# Altium PCB GR_carte_alim27.PcbDoc
Units mil, origin at the board's own origin, x right, y up, seen from the top; angles counter-clockwise.
Board outline 2769.97 x 3325 mil, 2 copper layers (Top Layer, Bottom Layer); 54 components, 25 nets, 128 pads, 0 vias.
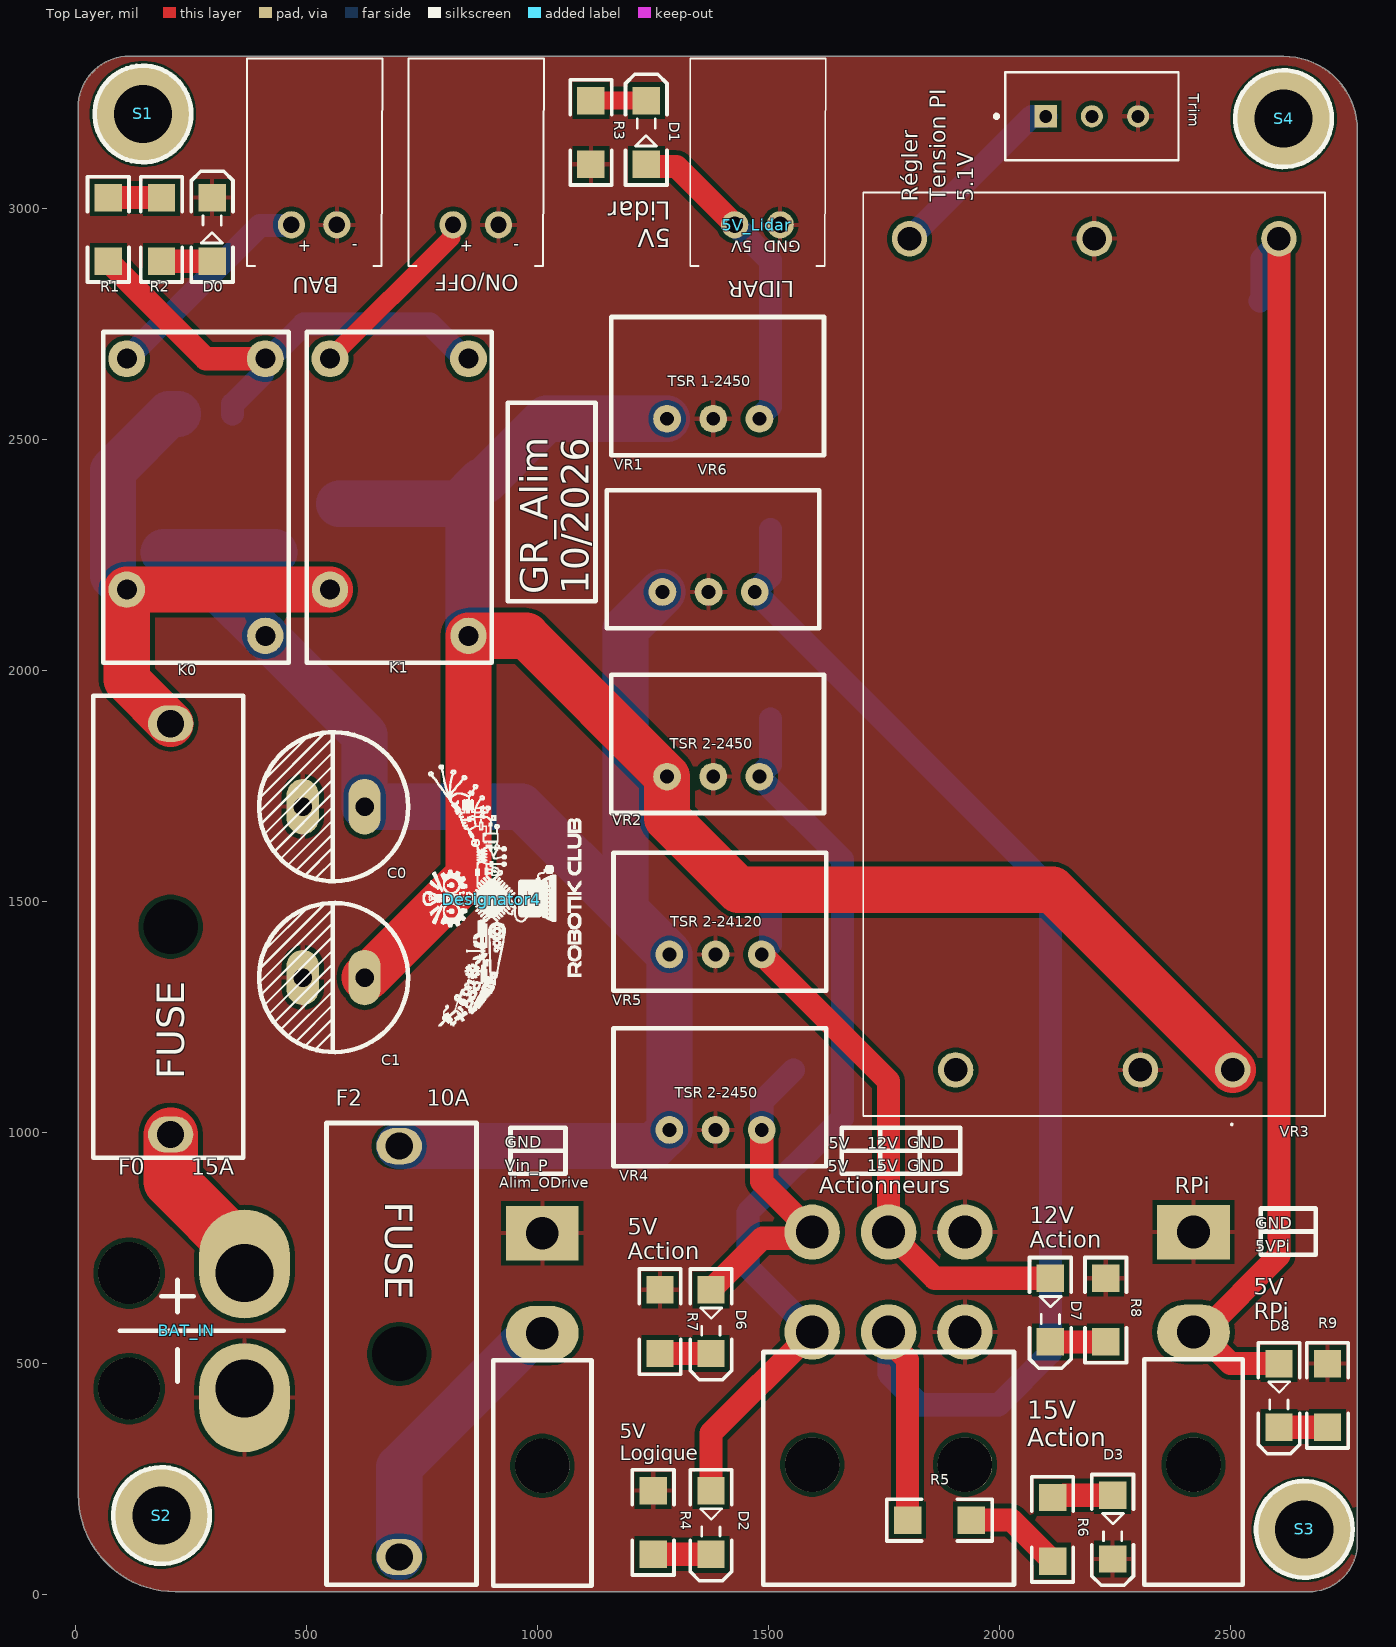
[diagram p0: Top Layer view]
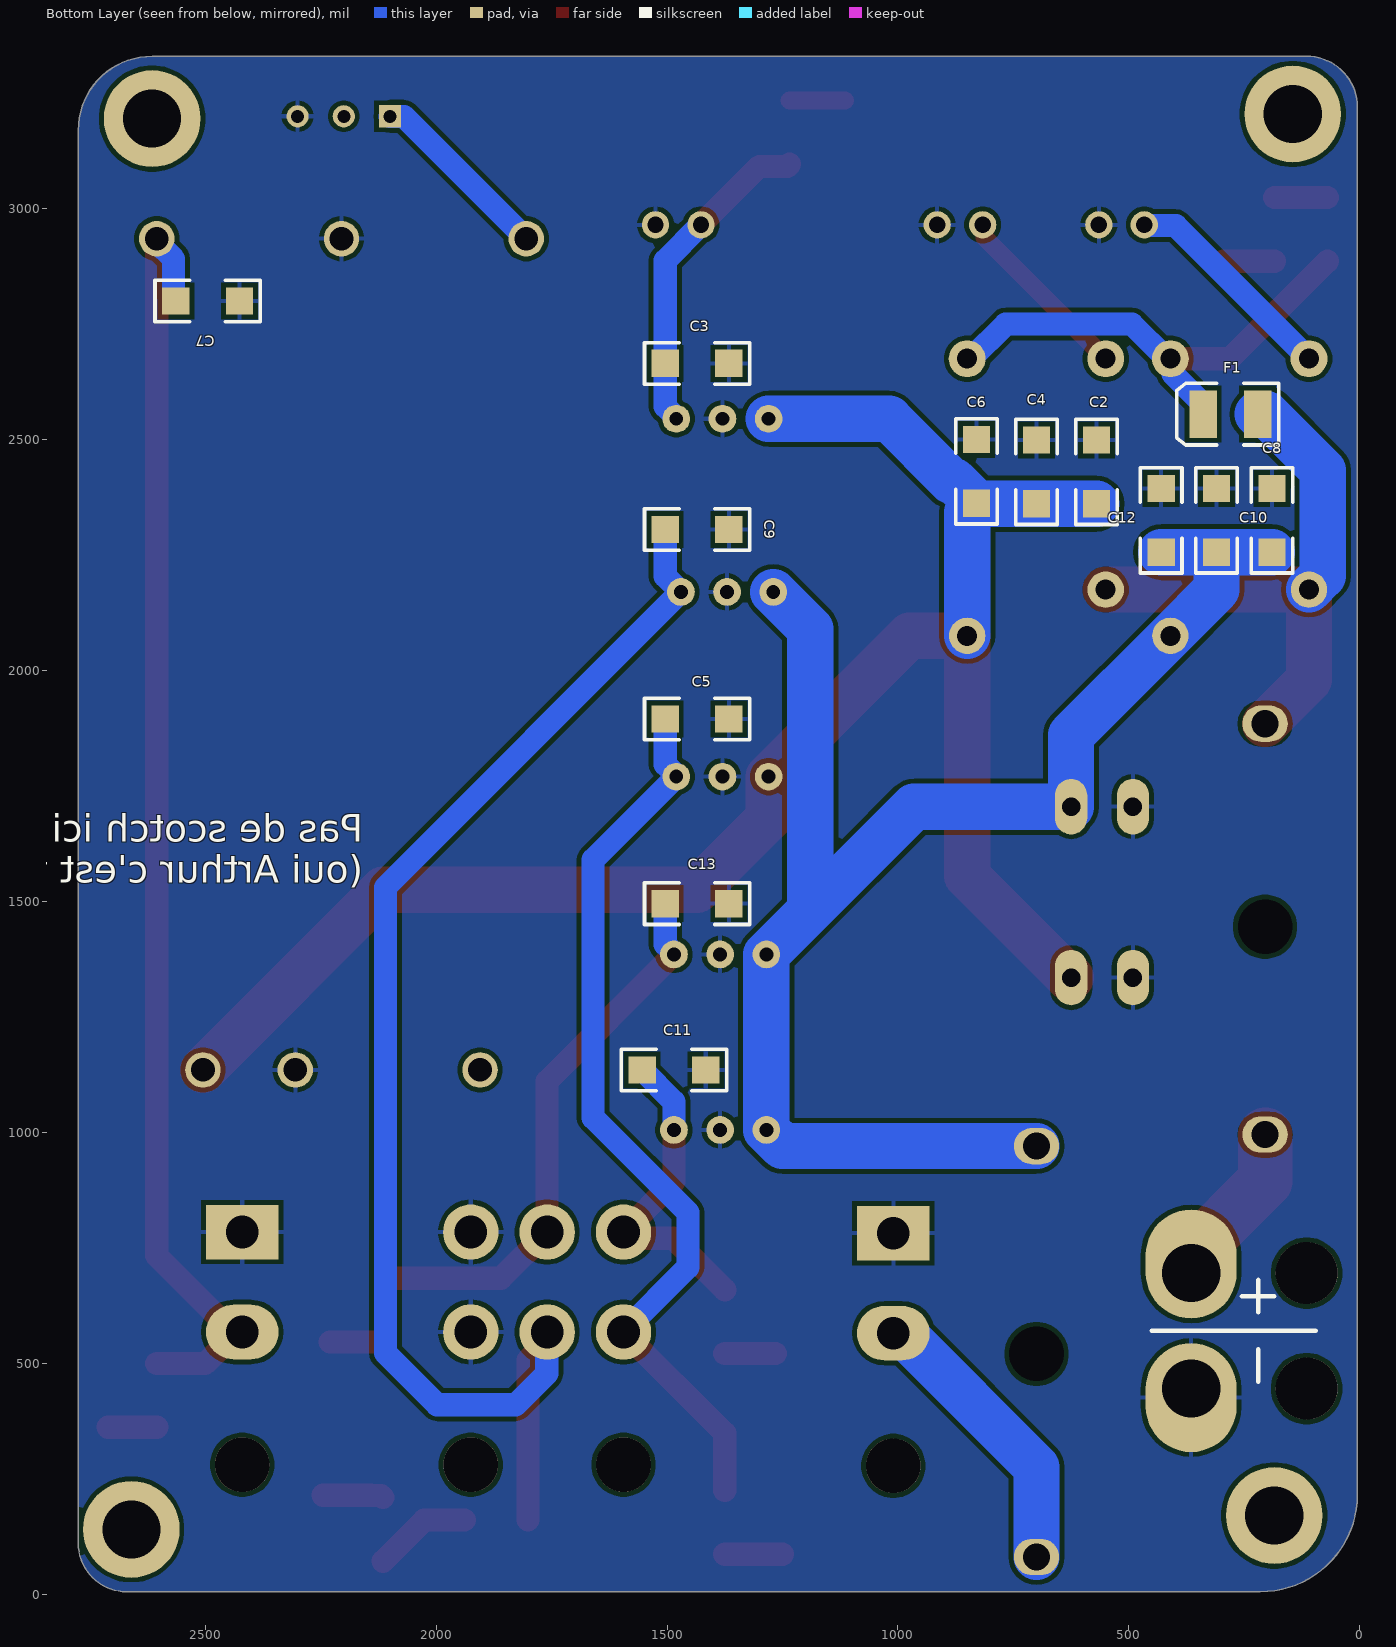
[diagram p1: Bottom Layer view, seen from below]

## Layer stack, top to bottom
Top Solder: solder mask 0.4, Solder Resist, Dk 3.5
Top Layer: signal copper 1.4
Dielectric 1: dielectric 12.6, FR-4, Dk 4.8
Bottom Layer: signal copper 1.4
Bottom Solder: solder mask 0.4, Solder Resist, Dk 3.5

## Board outline
5.03,215 5.03,3220 cw(c115.03,3220) 115.03,3330 2615,3330 cw(c2615,3170) 2775,3170 2775,110 cw(c2670,110) 2670,5 215.03,5 cw(c215.03,215)

## Design rules (kind name [scope] priority, off if disabled: settings)
Clearance [All] p1: gap=10 ignorepadtopadclearanceinfootprint=FALSE
PolygonConnect [All] p1: connectstyle=Relief reliefconductorwidth=10 reliefentries=4 polygonreliefangle="90 Angle" airgapwidth=10
RoutingVias [All] p1: holewidth=28 width=50 viastyle="Through Hole" minholewidth=28 minwidth=50 maxholewidth=28 maxwidth=50
SolderMaskExpansion [All] p1: expansion=4 istentingtop=FALSE
SupplyNets "Schematic Supply Nets_12" [InNet('A3_15V')] p1: voltage=0.000
SupplyNets "Schematic Supply Nets_9" [InNet('Vin_P')] p2: voltage=0.000
SupplyNets "Schematic Supply Nets_8" [InNet('V_Rel')] p3: voltage=0.000
SupplyNets "Schematic Supply Nets_7" [InNet('Vin_L')] p4: voltage=0.000
SupplyNets "Schematic Supply Nets_6" [InNet('5V_Pi')] p5: voltage=0.000
SupplyNets "Schematic Supply Nets_5" [InNet('A2_12V')] p6: voltage=0.000
SupplyNets "Schematic Supply Nets_4" [InNet('V_Bat')] p7: voltage=0.000
SupplyNets "Schematic Supply Nets_3" [InNet('5V_L')] p8: voltage=0.000
SupplyNets "Schematic Supply Nets_2" [InNet('A1_5V')] p9: voltage=0.000
SupplyNets "Schematic Supply Nets_1" [InNet('GND')] p10: voltage=0.000
SupplyNets "Schematic Supply Nets" [InNet('5V_Lid')] p11: voltage=0.000
Width [InNetClass('Power')] p1: maxlimit=100 minlimit=10 preferedwidth=59.06
30 further rules are at their usual default settings.

## Components (designator, comment, footprint, x,y, rotation, side; value= is the part's Value field where it differs from the comment)
5V_Lidar "Header 2H" S2B-XH-A 1426.57,2965 r0 top
Actionneurs "MinifitJr 3x2H" MOLEX_MINIFITJR_3X2 1759.68,567.4 r0 top
Alim_ODrive "MinifitJR 2H" Molex_MiniFitJr_2x1H 1010,565 r270 top
BAT_IN "Battery Onboard Solder" "Battery SALE" 365,445 r90 top
BAU "S2B-XH-A" S2B-XH-A 466.61,2965 r0 top
C0 "Cap2" Condensateur 625.03,1705 r180 top value=100µF
C1 "Cap2" Condensateur 625.03,1335 r180 top value=100µF
C2 "Cap" "Capacitor 1206" 570.03,2430 r270 bottom value=10µF
C3 "(optional)" "Capacitor 1206" 1435.03,2665 r0 bottom value=10µF
C4 "Cap" "Capacitor 1206" 700.03,2430 r270 bottom value=10µF
C5 "(optional)" "Capacitor 1206" 1435.03,1895 r0 bottom value=22µF
C6 "Cap" "Capacitor 1206" 830.03,2431.1 r270 bottom value=47µF
C7 "Cap" "Capacitor 1206" 2495,2800 r180 bottom value="220 uF"
C8 "Cap" "Capacitor 1206" 190,2325 r90 bottom value=10µF
C9 "(optional)" "Capacitor 1206" 1435.03,2305 r0 bottom value=10µF
C10 "Cap" "Capacitor 1206" 310,2325 r270 bottom value=10µF
C11 "(optional)" "Capacitor 1206" 1485,1135 r0 bottom value=10µF
C12 "Cap" "Capacitor 1206" 430,2325 r270 bottom value=10µF
C13 "(optional)" "Capacitor 1206" 1435.03,1495 r0 bottom value=22µF
D0 "V_Rel" KP-3216SEC 295.03,2955 r90 top
D1 "5V_L" KP-3216SEC 1235.03,3165 r90 top
D2 "5V_Lid" KP-3216SEC 1375.03,155 r270 top
D3 "V_Rel" KP-3216SEC 2245,145 r270 top
D6 "A_1" KP-3216SEC 1375.03,590 r270 top
D7 "A_2_12V" KP-3216SEC 2110,615 r270 top
D8 "A_2_12V" KP-3216SEC 2605,430 r270 top
Designator4 "Comment" Logo_lowres 900,1505 r90 top
F0 "8A max" "Fuse - duplicate" 205,995 r90 top
F1 "500mA" 3.5X2.8X1.9 280.03,2555 r0 bottom
F2 "8A max" "Fuse - duplicate" 700,970 r270 top
K0 "Relay-SPST" Relay 260.03,2375 r0 top
K1 "Relay-SPST" Relay 700.03,2375 r0 top
ON/OFF "S2B-XH-A" S2B-XH-A 816.61,2965 r0 top
R1 "Res2" "Resistor 1206" 70.03,2955 r90 top value=1K3
R2 "Res2" "Resistor 1206" 185.03,2955 r270 top value=1K3
R3 "Res2" "Resistor 1206" 1115.03,3165 r90 top value=300
R4 "Res2" "Resistor 1206" 1250.03,155 r270 top value=300
R5 "Res2" "Resistor 1206" 1870,160 r0 top value=1K3
R6 "Res2" "Resistor 1206" 2115,140 r90 top value=1K3
R7 "300" "Resistor 1206" 1265,590 r90 top
R8 "1K3" "Resistor 1206" 2230,615 r90 top
R9 "1K3" "Resistor 1206" 2710,430 r90 top
RPi "Header 2H" Molex_MiniFitJr_2x1H 2420,567.4 r270 top
S1 "Screw M3" "Screw M3" 145.03,3205 r0 top
S2 "Screw M3" "Screw M3" 185.03,170 r0 top
S3 "Screw M3" "Screw M3" 2660,140 r0 top
S4 "Screw M3" "Screw M3" 2615,3195 r0 top
Trim "30k" TRIM_3296W-1-303 2200,3200 r0 top
VR1 "TSR 1-2450" TRS 1280.03,2545 r180 top
VR2 "TSR 2-2450" TRS 1280.03,1770 r180 top
VR3 "TEN_30-2411WIN" TEN302411WIN 2505,1135 r0 top
VR4 "TSR 2-2450" TRS 1285.03,1005 r180 top
VR5 "TSR 2-24120" TRS 1285.03,1385 r180 top
VR6 "TSR 2-24150" TRS 1270,2170 r180 top

## Footprints (in the part's own frame and the unit in brackets; to place one, negate y for a bottom-side part, rotate by r counter-clockwise, add the part's x,y. Pads: shape width x height; smd on the part's side, far side on the other; paste and mask are expansions set on the pad)
3.5X2.8X1.9 [mm] "SM LED; 2 C-Bend Leads; Body 3.5 x 2.8 x 1.9 mm, inc leads (LxWxH typ)"
  rect 1.5x2.6 smd: 1(-1.5,0) 2(1.5,0)
  silkscreen extent -2.65,-1.7 2.95,1.7
"Battery SALE" [mm] "Connecteur Batterie"
  round 3.4 hole 3.4: 0(0,6.35) 0(6.35,6.35)
  oval 6x5 hole 3.2 copper offset -0.5,0: 1(0,0)
  oval 6x5 hole 3.2 copper offset 0.5,0: 2(6.35,0)
  silkscreen extent 0.38,-2.16 5.97,6.86
"Capacitor 1206" [mm]
  rect 1.5x1.5 smd: 1(-1.75,0) 2(1.75,0)
  silkscreen extent -2.89,-1.14 2.89,1.14, body extent -1.97,-0.99 1.97,0.96, height 1.3
Condensateur [mil]
  oval 70x120 hole 40: 1(0,0) 2(133.86,0)
  silkscreen extent -94,-161 228,161, body extent -93,-160 227,160, height 500
"Fuse - duplicate" [mm] "Porte-fusible monté sur circuit 10 (UL) A, 6.3 (VDE) A, fusible Cartouche, 893-0574"
  round 2 hole 3: 0(11.43,0)
  oval 2x2.5 hole 1.5: 1(0,0) 2(22.6,0)
  silkscreen extent -1.27,-4 24.13,4.25, body extent -1.27,-4.29 24.13,4.29, height 11.41
KP-3216SEC [mm]
  rect 1.5x1.5 smd: 1(-1.75,0) 2(1.75,0)
  silkscreen extent -2.89,-1.14 3.2,1.14, body extent -1.7,-0.79 1.5,0.81, height 1.1
Logo_lowres [mil]
  silkscreen extent -276,-194 291,148
Molex_MiniFitJr_2x1H [mm] "Connecteur Molex 2"
  rect 3x4 hole 1.8: 1(-5.5,0)
  oval 3x4 hole 1.8: 2(0,0)
  round 3 hole 3 unplated: 3(7.3,0)
  silkscreen extent 1.5,-2.7 13.9,2.7, body extent -6.03,-2.7 13.9,3.1, height 11.01
MOLEX_MINIFITJR_3X2 [mm] "MOLEX_MINIFITJR_3X2, 39-30-1060"
  round 3.048 hole 1.8: 1(-4.2,5.5) 2(-4.2,0) 3(0,5.5) 4(0,0) 5(4.2,5.5) 6(4.2,0)
  round 3 hole 3 unplated: 10(-4.2,-7.3) 11(4.2,-7.3)
  silkscreen extent -6.9,-13.9 6.9,-1.1, body extent -6.9,-13.9 7.3,6.04, height 11.41
Relay [mm] "SPST-NO Relay"
  round 2 hole 1.1: 1(3.81,-7.62) 2(-3.81,-5.08)
  round 2.032 hole 1.1: 3(-3.81,7.62) 4(3.81,7.62)
  silkscreen extent -5.09,-9.09 5.09,9.09, body extent -5.08,-9.14 5.08,9.14, height 15
"Resistor 1206" [mm]
  rect 1.5x1.5 smd: 1(-1.75,0) 2(1.75,0)
  silkscreen extent -2.89,-1.14 2.89,1.14, body extent -1.98,-0.95 1.98,0.93, height 0.55
S2B-XH-A [mm]
  round 1.5 hole 0.9: 1(0,0) 2(2.5,0)
  silkscreen extent -2.45,-2.26 5,9.14, body extent -2.41,-2.32 4.99,9.18, height 6.15
"Screw M3" [mm] "M3 iso Screw"
  round 5.32 hole 3.2 unplated: 0(0,0)
  silkscreen extent -2.66,-2.66 2.66,2.66
TEN302411WIN [mm]
  round 1.95 hole 1.3: 1(0,0) 2(-5.08,0) 3(-15.24,0) 4(2.54,45.72) 5(-7.62,45.72) 6(-17.78,45.72)
  silkscreen extent -20.32,-3.05 5.08,48.26, body extent -20.32,-2.79 5.08,48.01, height 11.03
TRIM_3296W-1-303 [mm]
  rect 1.218x1.218 / inner round 1.218 / far side rect 1.218x1.218 hole 0.71 mask+0.102: 1(-2.54,0)
  round 1.218 hole 0.71 mask+0.102: 2(0,0) 3(2.54,0)
  silkscreen extent -5.35,-2.41 4.76,2.42, body extent -4.76,-2.41 4.76,2.42, height 11.55
TRS [mil]
  round 60 hole 30: 1(0,0) 2(-100,0) 3(-200,0)
  silkscreen extent -340,-220 121,79, body extent -341,-218 120,80, height 398

## Part data
5V_Lidar RPi: "Header, 2-Pin, Right Angle", LatestRevisionDate=17-Jul-2002, LatestRevisionNote="Re-released for DXP Platform.", Publisher="Altium Limited"
Actionneurs: library part "Header 3X2H", "Header, 3-Pin, Dual row, Right Angle", LatestRevisionDate=17-Jul-2002, LatestRevisionNote="Re-released for DXP Platform.", Publisher="Altium Limited"
Alim_ODrive: library part "Header 2", "Header, 2-Pin", LatestRevisionDate=17-Jul-2002, LatestRevisionNote="Re-released for DXP Platform.", Publisher="Altium Limited"
BAT_IN: library part "Header 2", "Header, 2-Pin / Battery Onboard Solder / 24V", LatestRevisionDate=17-Jul-2002, LatestRevisionNote="Re-released for DXP Platform.", Publisher="Altium Limited"
BAU ON/OFF: library part S2B-XH-A-1_LF__SN_, "Connector", Arrow Part Number=S2B-XH-A-1(LF)(SN), Manufacturer_Name="JST (JAPAN SOLDERLESS TERMINALS)", Datasheet Link=http://www.jst-mfg.com/product/pdf/eng/eXH.pdf, Height=6.1mm, Manufacturer_Part_Number=S2B-XH-A-1(LF)(SN)
C0 C1 C2 C4 C6 C7 C8 C10 C12: "Capacitor", Publisher="Altium Limited"
  C0 C1: PackageDescription="Capacitor; 2 Leads", PackageReference=CAPR5-4X5, Published=23-Sep-2002
  C2 C4 C6 C7 C8 C10 C12: LatestRevisionDate=17-Jul-2002, LatestRevisionNote="Re-released for DXP Platform.", PackageDescription="Radial Cap, Thru-Hole; 2 Leads; 0.3 in Pin Spacing", PackageReference=RAD-0.3, Published=8-Jun-2000
C3 C5 C9 C11 C13: library part Cap, "Capacitor", LatestRevisionDate=17-Jul-2002, LatestRevisionNote="Re-released for DXP Platform.", PackageDescription="Radial Cap, Thru-Hole; 2 Leads; 0.3 in Pin Spacing", PackageReference=RAD-0.3, Published=8-Jun-2000, Publisher="Altium Limited"
D0 D1 D2 D3 D6 D7 D8: library part LED2, "Typical RED, GREEN, YELLOW, AMBER GaAs LED", LatestRevisionDate=17-Jul-2002, LatestRevisionNote="Re-released for DXP Platform.", PackageDescription="SM LED; 2 Flat Leads", PackageReference=3.2X1.6X1.1, PackageVersion=Feb-2002, Published=8-Jun-2000, Publisher="Altium Limited"
F0 F2: library part "Fuse 2", "Main Fuse", LatestRevisionDate=17-Jul-2002, LatestRevisionNote="Re-released for DXP Platform.", PackageDescription="Thru-Hole; 2 Leads", PackageReference=PIN-W2/E2.8, Published=8-Jun-2000, Publisher="Altium Limited"
F1: library part "Fuse 2", "Resettable fuse", LatestRevisionDate=17-Jul-2002, LatestRevisionNote="Re-released for DXP Platform.", PackageDescription="Thru-Hole; 2 Leads", PackageReference=PIN-W2/E2.8, Published=8-Jun-2000, Publisher="Altium Limited"
K0 K1: "Single-Pole Single-Throw Relay", LatestRevisionDate=17-Jul-2002, LatestRevisionNote="Re-released for DXP Platform.", PackageReference=MODULE4, Published=24-Mar-1999, Publisher="Altium Limited"
R1 R2 R3 R4 R5 R6: "Resistor", LatestRevisionDate=17-Jul-2002, LatestRevisionNote="Re-released for DXP Platform.", PackageDescription="Axial Device, Thru-Hole; 2 Leads; 0.4 in Pin Spacing", PackageReference=AXIAL-0.4, Published=8-Jun-2000, Publisher="Altium Limited"
R7 R8 R9: library part Res2, "Resistor", LatestRevisionDate=17-Jul-2002, LatestRevisionNote="Re-released for DXP Platform.", PackageDescription="Axial Device, Thru-Hole; 2 Leads; 0.4 in Pin Spacing", PackageReference=AXIAL-0.4, Published=8-Jun-2000, Publisher="Altium Limited"
Trim: library part 3296W-1-303, "TRIMMER - 3/8in SQ MT CERMET", Package="NON STANDARD-3 Bourns", Check_prices=https://www.snapeda.com/parts/3296W-1-303/Bourns/view-part/?ref=eda, MF=Bourns, MP=3296W-1-303, SnapEDA_Link=https://www.snapeda.com/parts/3296W-1-303/Bourns/view-part/?ref=snap
VR1 VR2 VR4 VR5 VR6: library part "Volt Reg", "Voltage Regulator", LatestRevisionDate=29-May-2009, LatestRevisionNote="IPC-7351 Footprint Added.", PackageDescription="3-Pin Transistor Outline Package 2.54 mm Pitch, 15.1 mm Lead Span", PackageReference=D2PAK, Published=24-Mar-1999, Publisher="Altium Limited"
VR3: "Power Supply", Manufacturer_Name="Traco Power", Manufacturer_Part_Number="TEN 30-2411WIN", Mouser Part Number=495-TEN-30-2411WIN, Datasheet Link=https://tracopower.com/ten30win-datasheet/, Height=10.7mm, Mouser Price/Stock=https://www.mouser.co.uk/ProductDetail/TRACO-Power/TEN-30-2411WIN?qs=ckJk83FOD0WILf%252BNmub5Yg%3D%3D

## Nets (pads, with @x,y where several pads share a name; then routed paths per layer and width w, separated by ;. In a path a pad name is that pad's centre, name@x,y a point inside that pad or via, vN(x,y) a via of type N, cw(c..) or ccw(c..) an arc to the next point about the centre after c; other vN are vias at no path point)
5V_L: Actionneurs.2 C5.2 D2.1 VR2.3 | length 1989
  Top Layer w50: D2.1 1375.03,348.11 Actionneurs.2
  Bottom Layer w50: C5.2 1503.93,1796.6 1480.03,1772.71 VR2.3 1660,1590.03 1660,1031.31 1455,826.31 1455,707.64 1594.32,568.32 Actionneurs.2
5V_Lid: 5V_Lidar.1 C3.2 D1.1 VR1.3 | length 707.8
  Top Layer w50: D1.1 1239.56,3091.57 1300,3091.57 5V_Lidar.1
  Bottom Layer w50: 5V_Lidar.1 1503.93,2887.65 C3.2 1503.93,2571.6 1480.03,2547.71 VR1.3
5V_Pi: C7.1 D8.1 RPi.2 VR3.4 | length 2809.2
  Top Layer w50: RPi.2 2439.69,567.4 2605,732.72 VR3.4 ; RPi.2@2431.97,567.4 2500.47,498.9 D8.1
  Bottom Layer w50: C7.1 2568.43,2804.53 2568.43,2891.18 2605,2927.76 VR3.4
A1_5V: Actionneurs.1 C11.2 D6.1 VR4.3 | length 695.9
  Top Layer w50: D6.1 1486.68,770.54 1580.93,770.54 Actionneurs.1 1485.03,893.23 VR4.3
  Bottom Layer w50: VR4.3 1485.03,1066.13 C11.2
A2_12V: Actionneurs.3 C13.2 D7.1 VR5.3 | length 1224.4
  Top Layer w50: VR5.3 1759.68,1110.35 Actionneurs.3 1859.72,683.9 D7.1
  Bottom Layer w50: VR5.3 1485.03,1387.71 1503.93,1406.6 C13.2
A3_15V: Actionneurs.4 C9.2 R5.1 VR6.3 | length 3000.8
  Top Layer w50: Actionneurs.4 1759.68,548.46 1801.1,507.03 R5.1
  Bottom Layer w50: C9.2 1503.93,2203.93 VR6.3 2110,1530 2110,522.11 1997.89,410 1827.89,410 1760.54,477.35 1760.54,566.53 Actionneurs.4
GND: 5V_Lidar.2 Actionneurs.5 Actionneurs.6 Alim_ODrive.1 BAT_IN.1 BAU.2 C0.2 C1.2 C2.1 C3.1 C4.1 C5.1 C6.1 C7.2 C8.2 C9.1 C10.1 C11.1 C12.1 C13.1 D0.2 D3.2 ON/OFF.2 R3.1 R4.1 R7.2 R8.2 R9.2 RPi.1 Trim.3 VR1.2 VR2.2 VR3.2 VR3.5 VR4.2 VR5.2 VR6.2
NetAlim_ODrive_2: Alim_ODrive.2 F2.2 | length 624.7
  Bottom Layer w100: F2.2 700,274.69 990.31,565 Alim_ODrive.2
NetBAT_IN_2: BAT_IN.2 F0.1 | length 366.3
  Top Layer w39.37: BAT_IN.2 BAT_IN.2@365,734.37
  Top Layer w118.11: F0.1 205,894.37 BAT_IN.2@365,734.37
NetBAU_1: BAU.1 K0.3 | length 476.7
  Bottom Layer w50: K0.3 398.3,2963.27 464.87,2963.27 BAU.1
NetD0_1: D0.1 R2.2 | length 110
  Top Layer w50: R2.2 D0.1
NetD1_2: D1.2 R3.2 | length 120
  Top Layer w39.37: R3.2 D1.2
NetD2_2: D2.2 R4.2 | length 125
  Top Layer w50: R4.2 D2.2
NetD3_1: D3.1 R6.2 | length 132.1
  Top Layer w50: R6.2 2119.53,213.43 2140,213.43 2140.47,213.9 D3.1
NetD6_2: D6.2 R7.1 | length 110
  Top Layer w50: R7.1 D6.2
NetD7_2: D7.2 R8.1 | length 120
  Top Layer w50: D7.2 R8.1
NetD8_2: D8.2 R9.1 | length 105
  Top Layer w50: D8.2 R9.1
NetK1_3: K1.3 ON/OFF.1 | length 400.4
  Top Layer w39.37: K1.3 812.84,2937.81 812.84,2961.23 ON/OFF.1
NetR1_2: R1.2 R2.1 | length 115
  Top Layer w50: R1.2 R2.1
NetR5_2: R5.2 R6.1 | length 212.9
  Top Layer w50: R5.2 2026.1,160 R6.1
NetTrim_1: Trim.1 VR3.6 | length 404.8
  Bottom Layer w50: VR3.6 2070,3200 Trim.1
V_Bat: F0.2 F1.1 K0.2 K1.2 | length 1231.7
  Top Layer w100: F0.2 110.03,1979.73 K0.2 K1.2
  Bottom Layer w100: K0.2 80,2205.03 80,2433.32 201.68,2555 F1.1
V_Rel: F1.2 K0.4 K1.4 R1.1 | length 1079
  Top Layer w50: R1.1 281.13,2675 K0.4
  Bottom Layer w50: F1.2 339.09,2576.65 404.29,2641.86 404.29,2669.26 K0.4 418.15,2675 493.15,2750 766.91,2750 841.91,2675 K1.4
Vin_L: C1.1 C2.2 C4.2 C6.2 K1.1 VR1.1 VR2.1 VR3.1 | length 4014.9
  Top Layer w100: C1.1 630.03,1335 850.03,1555 K1.1 975.03,2075 VR2.1 1280.03,1679.97 1435,1525 2115,1525 VR3.1
  Bottom Layer w100: C2.2 C4.2 828.93,2361.1 C6.2 ; K1.1 850.03,2342.2 C6.2 ; VR1.1 1018.94,2545 884.41,2410.47 878.3,2410.47 C6.2
Vin_P: C0.1 C8.1 C10.2 C12.2 F2.1 K0.1 VR4.1 VR5.1 VR6.1 | length 3416.8
  Bottom Layer w100: C8.1 C10.2 ; C12.2 C10.2 ; F2.1 1250.03,970 VR4.1 VR5.1 1190.03,1480 ; VR6.1 1190.03,2090.03 1190.03,1480 ; C10.2 310,2175.03 K0.1 625.03,1860 C0.1 965.03,1705 1190.03,1480
pads on no net: Actionneurs.10 Actionneurs.11 Alim_ODrive.3 BAT_IN.0 F0.0 F2.0 RPi.3 S1.0 S2.0 S3.0 S4.0 Trim.2 VR3.3

## Polygon pours and split planes (outlines as drawn)
GND on Top Layer "GND_L01_P000" (solid, remove dead copper, pour order 0): 5.03,215 5.03,3220 cw(c115.03,3220) 115.03,3330 2615,3330 cw(c2615,3170) 2775,3170 2775,110 cw(c2670,110) 2670,5 215.03,5 cw(c215.03,215)
GND on Bottom Layer "GND_L02_P001" (solid, remove dead copper, pour order 1): 5.03,215 5.03,3220 cw(c115.03,3220) 115.03,3330 2615,3330 cw(c2615,3170) 2775,3170 2775,110 cw(c2670,110) 2670,5 215.03,5 cw(c215.03,215)

## Silkscreen, mask and mechanical layers (free items; w line width, h text height)
Top Overlay:
  lines w10: 941,960 1060,960 ; 1658,960 1909,960 ; 1742,910 1742,1010 ; 1827,910 1827,1010 ; 2566,785 2685,785 ; 935,2150 1125,2150 1125,2580 935,2580 935,2150 ; 941,910 941,1010 1060,1010 1060,910 941,910 ; 1658,910 1658,1010 1915,1010 1915,910 1658,910 ; 2566,735 2685,735 2685,835 2566,835 2566,735
  text "5V / Lidar" at 1287.8,3015 h39.37 r180
  text "Régler / Tension PI / 5.1V" at 1955,3015.05 h60 r90
  text "+" at 510.03,2930 h25 r180
  text "-" at 610.03,2930 h25 r180
  text "+" at 860.03,2930 h25 r180
  text "-" at 960.03,2930 h25 r180
  text "5V" at 1465,2930 h25 r180
  text "GND" at 1570,2930 h25 r180
  text "LIDAR" at 1555,2855 h60 r180
  text "GR_Alim / 10/2026" at 1110,2165 h59.06 r90
  text "10A" at 760,1045.65 h60
  text "GND" at 929,966 h25
  text "GND" at 1800,965 h25
  text "5V" at 1630,964 h25
  text "12V" at 1714,964 h25
  text "Vin_P" at 929,916 h25
  text "15V" at 1714,915 h25
  text "GND" at 1800,915 h25
  text "5V" at 1628,914 h25
  text "15A" at 250,895.65 h60
  text "GND" at 2554,791 h25
  text "12V / Action" at 2065.05,750 h35.43
  text "5VPi" at 2554,741 h25
  text "5V / Action" at 1195.08,725 h35.43
  text "5V / RPi" at 2550.05,595 h35.43
  text "15V / Action" at 2060.05,320 h39.37
  text "5V / Logique" at 1177.12,290 h31.5
Bottom Overlay:
  text "Pas de scotch ici please / (oui Arthur c'est toi)" at 2158.13,1540.77 h59.06

## Text inside footprints (layer, text, board x,y; h text height)
F0: Top Overlay "FUSE" at 235,1115 h60 r90
F2: Top Overlay "FUSE" at 670,850 h60 r270